# Altium PCB PCB1.PcbDoc (part 1 of 2)
Units mil, origin at the board's own origin, x right, y up, seen from the top; angles counter-clockwise.
Board outline 2505 x 2250 mil, 4 copper layers (Top Layer, GND1, GND2, Bottom Layer), stack 23.756 mil thick; 96 components, 62 nets, 306 pads, 129 vias.
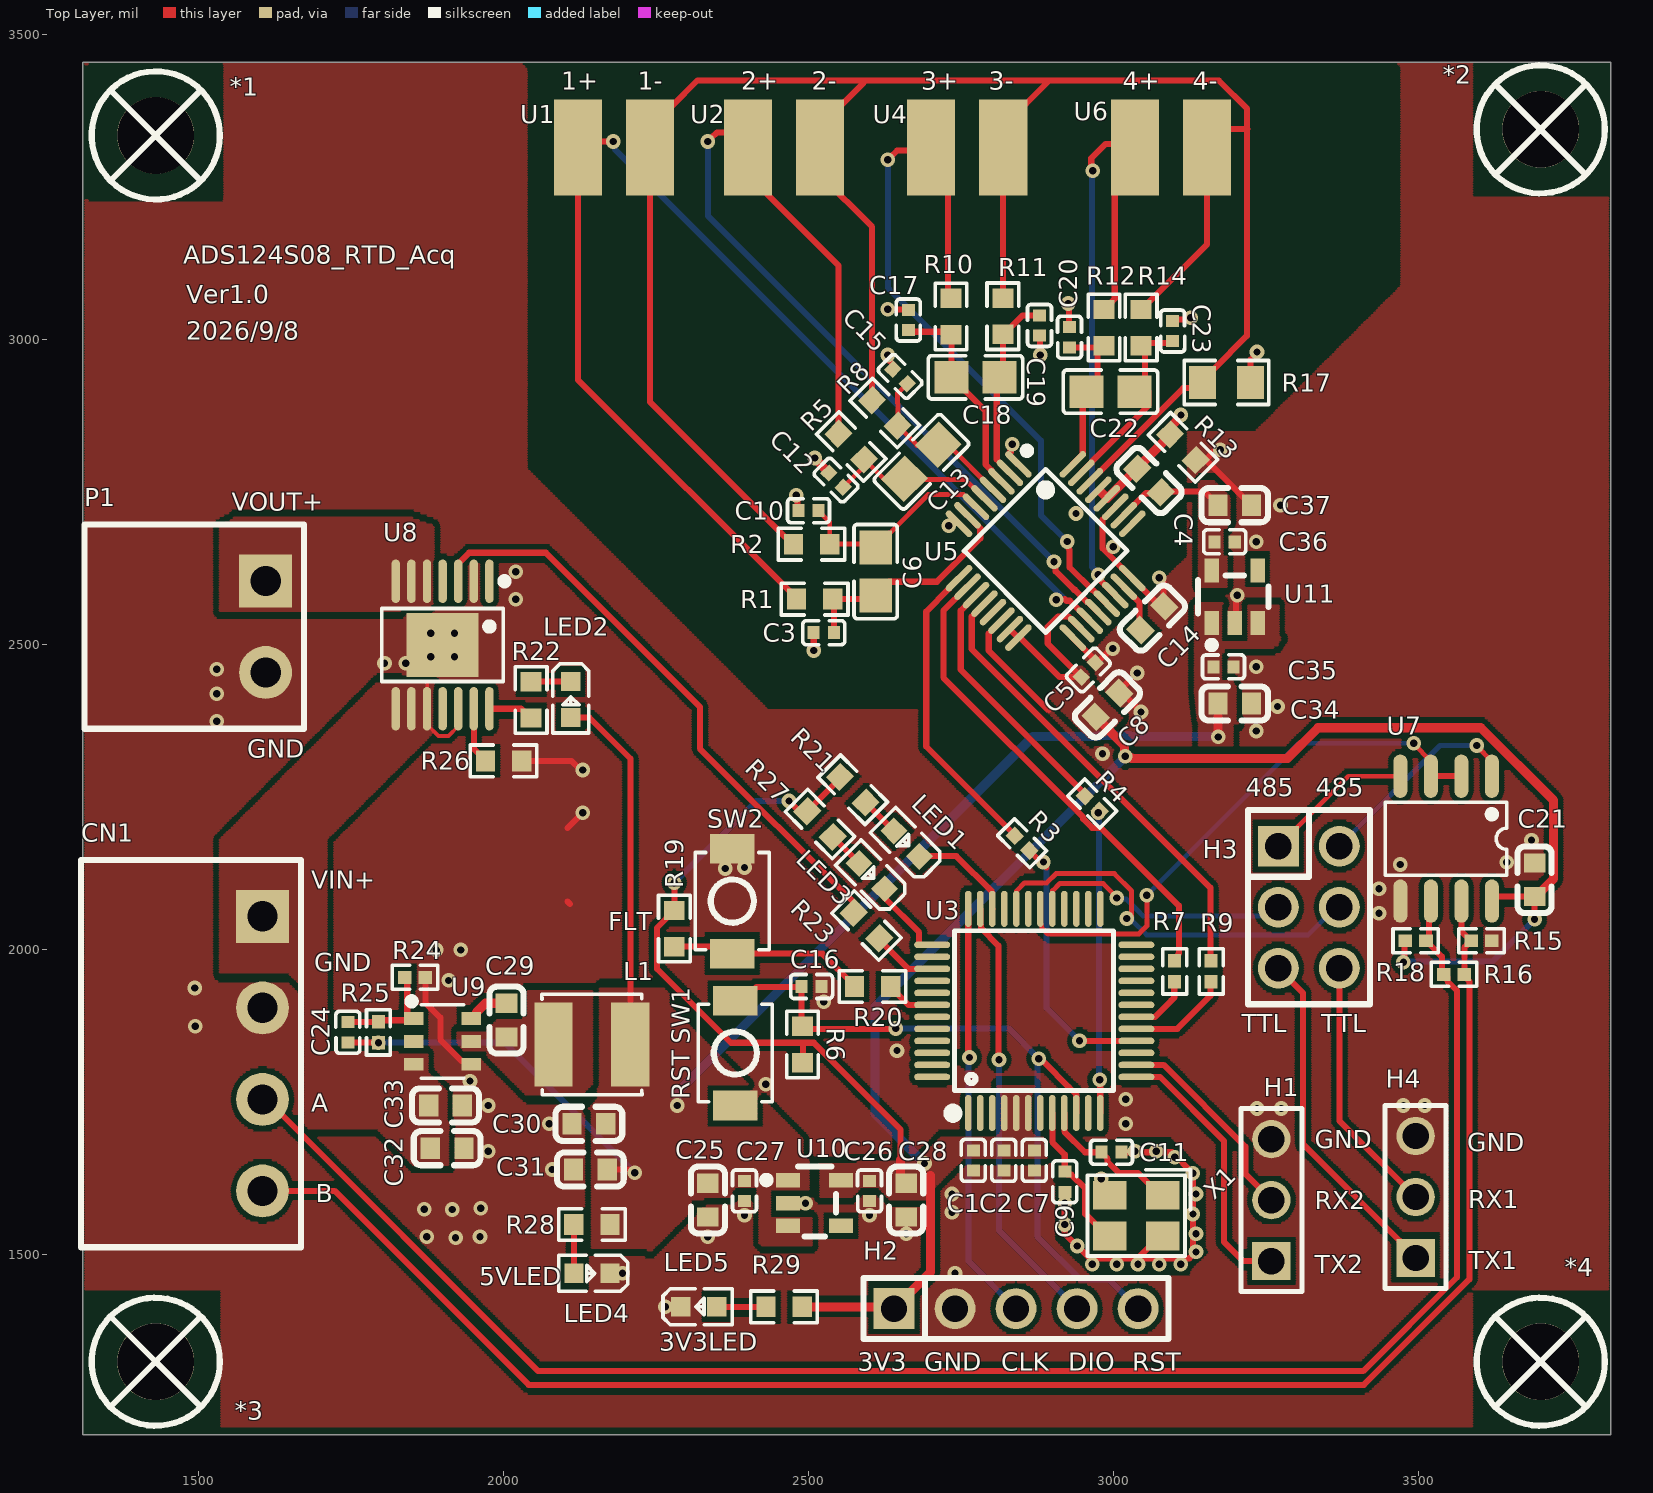
[diagram p0: Top Layer view]
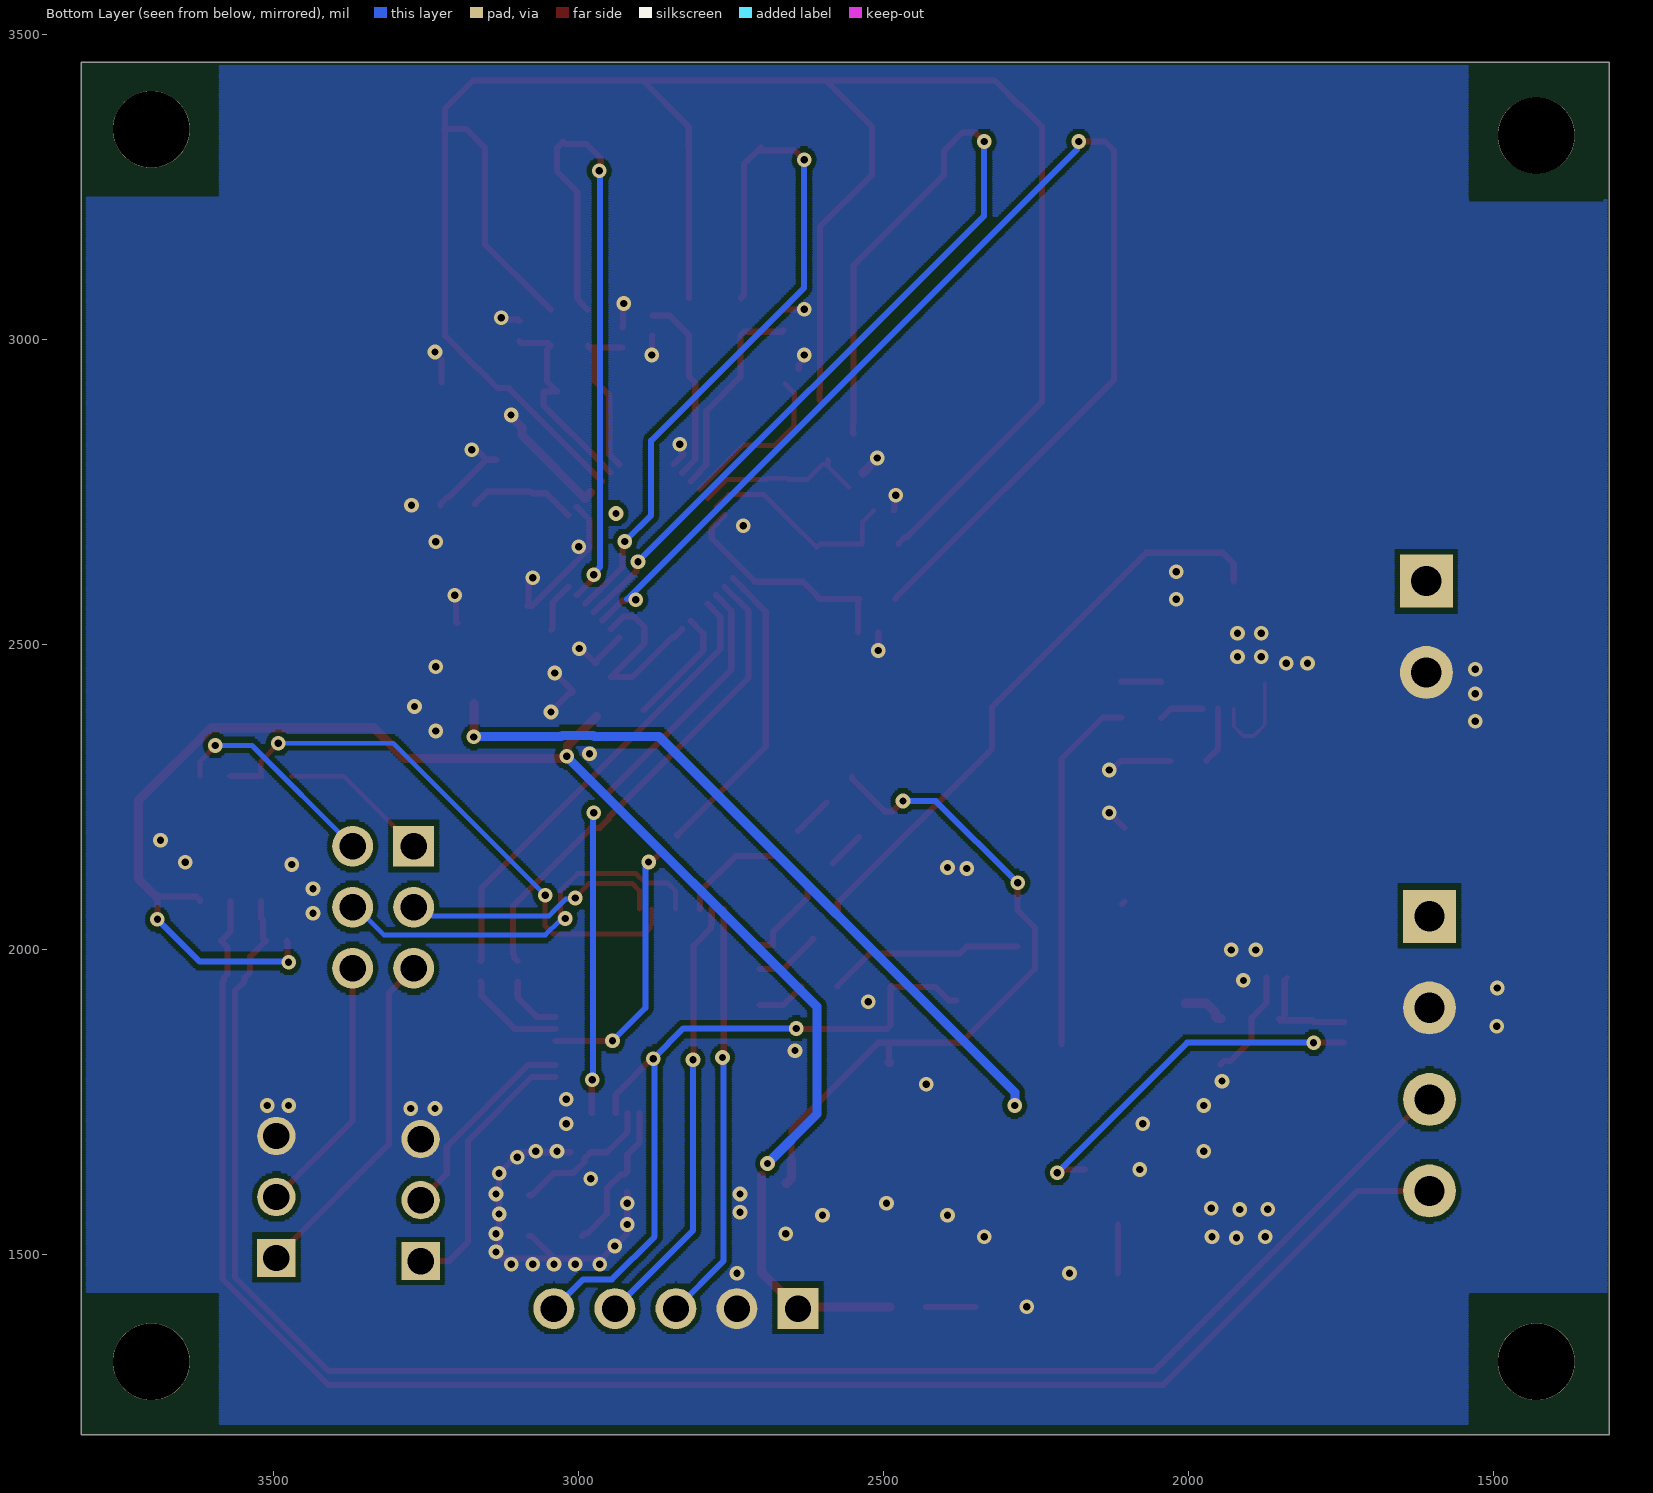
[diagram p1: Bottom Layer view, seen from below]
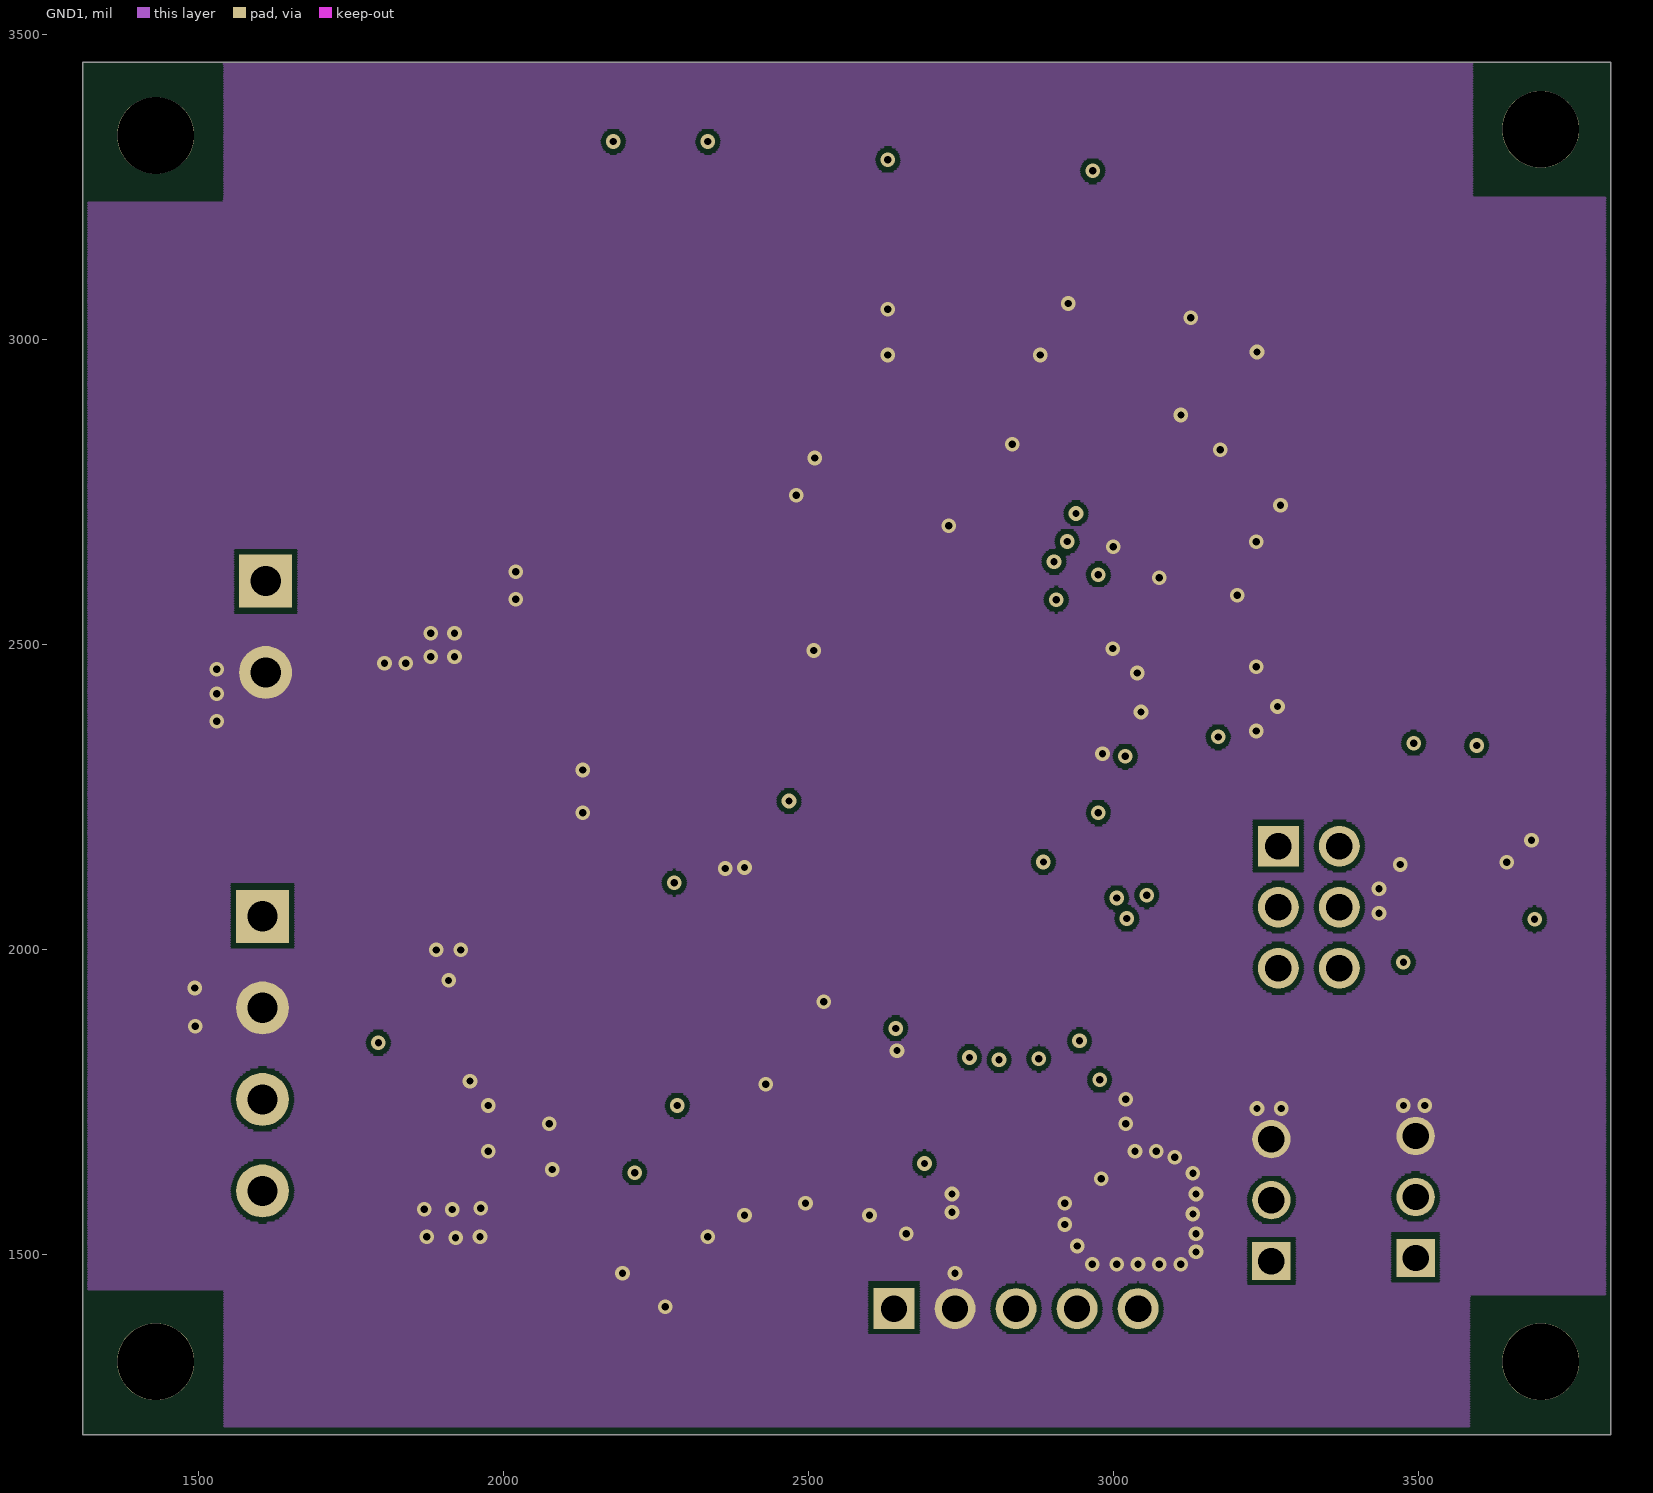
[diagram p2: GND1]
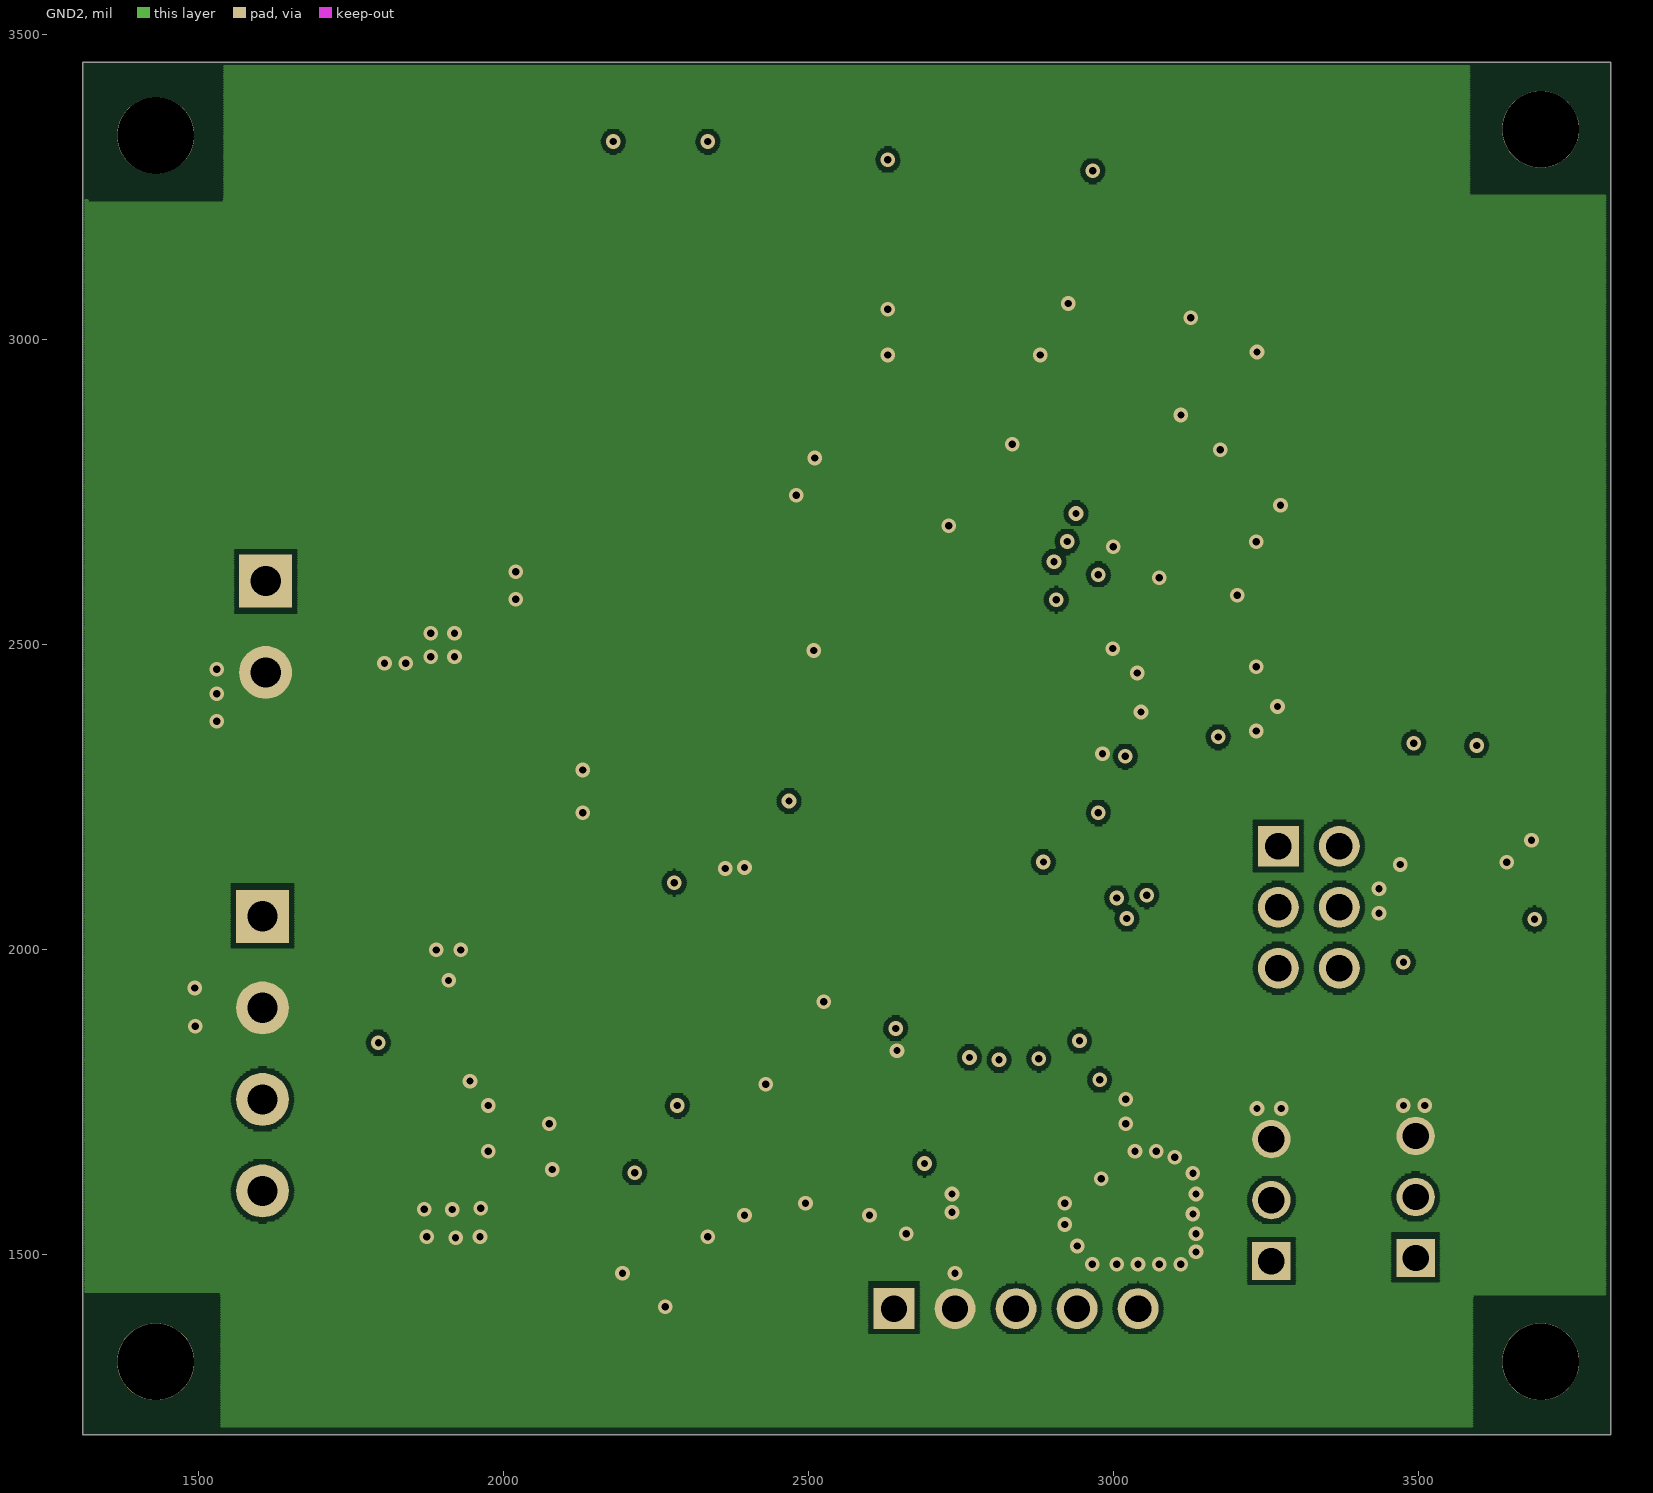
[diagram p3: GND2]

## Layer stack, top to bottom
Top Solder: solder mask 0.4, Solder Resist, Dk 3.5
Top Layer: signal copper 1.4
Dielectric 2: prepreg 2.8, PP-006, Dk 4.1
GND1: signal copper 1.378
Dielectric 1: dielectric 12.6, FR-4, Dk 4.8
GND2: signal copper 1.378
Dielectric 3: prepreg 2.8, PP-006, Dk 4.1
Bottom Layer: signal copper 1.4
Bottom Solder: solder mask 0.4, Solder Resist, Dk 3.5

## Board outline
1310,1205 1310,3455 3815,3455 3815,1205

## Design rules (kind name [scope] priority, off if disabled: settings)
Clearance [All] p1: gap=8 ignorepadtopadclearanceinfootprint=FALSE except(4: Arc-Arc Arc-Track Track-Track; 6: Arc-SMDPad Arc-THPad Arc-Via Track-SMDPad Track-THPad Track-Via SMDPad-SMDPad SMDPad-THPad SMDPad-Via THPad-THPad THPad-Via Via-Via)
ComponentClearance [All] p1: gap=0 collisioncheckmode=3 verticalgap=0 showdistances=FALSE
HoleSize [All] p1: absolutevalues=TRUE maxlimit=130 minlimit=1 maxpercent=80.000 minpercent=20.000
MinimumSolderMaskSliver [All] p1: minsoldermaskwidth=4
PlaneConnect [All] p1: planeconnectstyle=Direct reliefexpansion=20 reliefentries=4 reliefconductorwidth=10 reliefairgap=10
PolygonConnect [All] p1: connectstyle=Direct reliefconductorwidth=10 reliefentries=4 polygonreliefangle="90 Angle" airgapwidth=10
RoutingVias [All] p1: holewidth=28 width=50 viastyle="Through Hole" minholewidth=28 minwidth=50 maxholewidth=28 maxwidth=50
SilkToSilkClearance [All] p1: silktosilkclearance=2
SilkToSolderMaskClearance [IsPad] p1: minsilkscreentomaskgap=2 clearancetoexposedcopper=TRUE
SolderMaskExpansion [All] p1: expansion=0 istentingtop=FALSE
SupplyNets "Schematic Supply Nets_2" [InNet('VOUT')] p1: voltage=0.000
SupplyNets "Schematic Supply Nets_7" [InNet('GND')] p2: voltage=0.000
SupplyNets "Schematic Supply Nets_6" [InNet('VIN')] p3: voltage=0.000
SupplyNets "Schematic Supply Nets_5" [InNet('A3V3')] p4: voltage=0.000
SupplyNets "Schematic Supply Nets" [InNet('3V3')] p5: voltage=0.000
SupplyNets "Schematic Supply Nets_4" [InNet('5V')] p6: voltage=0.000
Width [All] p1: maxlimit=50 minlimit=6 preferedwidth=10
24 further rules are at their usual default settings.

## Components (designator, comment, footprint, x,y, rotation, side; value= is the part's Value field where it differs from the comment)
*1 "螺丝孔_1" M3螺丝 1430,3335 r0 top
*2 "螺丝孔_1" M3螺丝 3700,3345 r0 top
*3 "螺丝孔_1" M3螺丝 1430,1325 r0 top
*4 "螺丝孔_1" M3螺丝 3700,1325 r0 top
C1 "cc0402krx7r7bb104" C0402 2770,1655 r270 top value=100nF
C2 "cc0402krx7r7bb104" C0402 2820,1655 r270 top value=100nF
C3 "grm1555c1h472je01d" C0402 2525,2520 r180 top value=4.7nF
C4 "cl10b474ka8nnnc" C0603 3058.04,2769.4 r135 top value=470nF
C5 "cc0402krx7r7bb104" C0402 2958.55,2458.89 r225 top value=100nF
C6 "cl21b103kbannnc" C0805 2610,2620 r270 top value=10nF
C7 "cc0402krx7r7bb104" C0402 2870,1655 r270 top value=100nF
C8 "hgc0603r5106m350nthj" C0603 2989.94,2401.65 r45 top value=10uF
C9 "cc0402jrnpo9bn180" C0402 2920,1620 r270 top value=18pF
C10 "grm1555c1h472je01d" C0402 2500,2720 r180 top value=4.7nF
C11 "cc0402jrnpo9bn180" C0402 2996.46,1668.39 r180 top value=18pF
C12 "grm1555c1h472je01d" C0402 2545,2770 r135 top value=4.7nF
C13 "cl21b103kbannnc" C0805 2685,2800 r225 top value=10nF
C14 "cga0603x5r105k500jt" C0603 3063.55,2543.89 r45 top value=1uF
C15 "grm1555c1h472je01d" C0402 2650,2940 r135 top value=4.7nF
C16 "cc0402krx7r7bb104" C0402 2505,1940 r180 top value=100nF
C17 "grm1555c1h472je01d" C0402 2663.55,3032.35 r90 top value=4.7nF
C18 "cl21b103kbannnc" C0805 2773.55,2938.55 r180 top value=10nF
C19 "grm1555c1h472je01d" C0402 2878.55,3023.55 r270 top value=4.7nF
C20 "grm1555c1h472je01d" C0402 2927.77,3004.06 r90 top value=4.7nF
C21 "c1608x7r1a155kt000e" C0603 3690,2115 r270 top value=1.5uF
C22 "cl21b103kbannnc" C0805 2995,2915 r180 top value=10nF
C23 "grm1555c1h472je01d" C0402 3096.72,3014.31 r90 top value=4.7nF
C24 "cc0402jrnpo9bn101" C0402 1745,1865 r270 top value=100pF
C25 "cga0603x5r105k500jt" C0603 2335,1590 r270 top value=1uF
C26 "cc0402krx7r7bb104" C0402 2600,1605 r270 top value=100nF
C27 "cc0402krx7r7bb104" C0402 2395,1605 r270 top value=100nF
C28 "cga0603x5r105k500jt" C0603 2660,1590 r270 top value=1uF
C29 "cga0603x7r104k500jt" C0603 2005,1885 r90 top value=100nF
C30 "hgc0603r5226m160nthj" C0603 2140,1715 r0 top value=22uF
C31 "hgc0603r5226m160nthj" C0603 2142.44,1640 r0 top value=22uF
C32 "hgc0603r5106m350nthj" C0603 1907.56,1675 r180 top value=10uF
C33 "cga0603x7r104k500jt" C0603 1905,1745 r180 top value=100nF
C34 "cga0603x5r105k500jt" C0603 3198.55,2403.89 r0 top value=1uF
C35 "cc0402krx7r7bb104" C0402 3180.09,2463.89 r0 top value=100nF
C36 "cc0402krx7r7bb104" C0402 3182.01,2668.89 r0 top value=100nF
C37 "cga0603x5r105k500jt" C0603 3198.55,2728.89 r0 top value=1uF
CN1 "wj15edgrc-3.81-04p-14-00a" CONN-TH_WJ15EDGRC-3.81-4P 1605,1830 r270 top
H1 "lail-pz2.54-3p-l" HDR-TH_3P-P2.54-V-M-1 3258.69,1590 r90 top
H2 "pz254v-11-05p" HDR-TH_5P-P2.54-V-M 2840.05,1412.16 r0 top
H3 "pz254v-12-6p" HDR-TH_6P-P2.54-V-M-R2-C3-S2.54 3320,2070 r270 top
H4 "lail-pz2.54-3p-l" HDR-TH_3P-P2.54-V-M-1 3495,1595 r90 top
L1 "wpn4020h100mt" IND-SMD_L4.0-W4.0 2145,1845 r0 top value=10uH
LED1 "ltst-c190kskt" LED0603-RD 2660.85,2174.15 r135 top
LED2 "ltst-c190kskt" LED0603-RD 2110.18,2410.3 r270 top
LED3 "ltst-c190kskt" LED0603-RD 2603.89,2121.11 r135 top
LED4 "ltst-c190kskt" LED0603-RD 2145,1470 r180 top
LED5 "ltst-c190kskt" LED0603-RD 2320,1415 r0 top
P1 "wj15edgrc-3.81-02p-14-00a" CONN-TH_2P-P3.81_WJ15EDGRC-3.81-2P 1610.17,2529.78 r270 top
R1 "frc0603f1000ts" R0603 2510,2575 r180 top value=100Ω
R2 "frc0603f1000ts" R0603 2505,2665 r180 top value=100Ω
R3 "frc0402f47r0ts" R0402 2850,2175 r135 top value=47Ω
R4 "frc0402f47r0ts" R0402 2965,2240 r135 top value=47Ω
R5 "frc0603f1000ts" R0603 2570,2825 r135 top value=100Ω
R6 "frc0603f1002ts" R0603 2490,1845 r270 top value=10kΩ
R7 "frc0402f47r0ts" R0402 3100,1965 r90 top value=47Ω
R8 "frc0603f1000ts" R0603 2625,2880 r135 top value=100Ω
R9 "frc0402f47r0ts" R0402 3160,1965 r90 top value=47Ω
R10 "frc0603f1000ts" R0603 2733.55,3038.21 r90 top value=100Ω
R11 "frc0603f1000ts" R0603 2818.55,3038.55 r90 top value=100Ω
R12 "frc0603f1000ts" R0603 2984.32,3020 r90 top value=100Ω
R13 "0603waf0000t5e" R0603 3113.55,2823.89 r135 top value=0Ω
R14 "frc0603f1000ts" R0603 3045,3020 r90 top value=100Ω
R15 "0402wgf1001tce" R0402 3602.96,2015 r0 top value=1kΩ
R16 "0402wgf1200tce" R0402 3557.96,1960 r0 top value=120Ω
R17 "frc0805f3001ts" R0805 3185,2930 r0 top value=3kΩ
R18 "0402wgf1001tce" R0402 3495,2015 r0 top value=1kΩ
R19 "frc0603f4701ts" R0603 2280,2035 r90 top value=4.7kΩ
R20 "frc0603j471 ts" R0603 2605,1940 r180 top value=470Ω
R21 "0603waf1001t5e" R0603 2572.47,2262.54 r135 top value=1kΩ
R22 "0603waf1001t5e" R0603 2045.17,2409.78 r90 top value=1kΩ
R23 "0603waf1001t5e" R0603 2595,2040 r135 top value=1kΩ
R24 "rt0402brd0726k1l" R0402 1855,1955 r180 top value=26.1kΩ
R25 "frc0402f1373ts" R0402 1795,1865 r90 top value=137kΩ
R26 "frc0603f3601ts" R0603 2000.17,2309.78 r0 top value=3.6kΩ
R27 "0603waf1001t5e" R0603 2518.8,2206.2 r135 top value=1kΩ
R28 "0603waf1001t5e" R0603 2145,1550 r0 top value=1kΩ
R29 "0603waf1001t5e" R0603 2460,1415 r0 top value=1kΩ
SW1 "ts-1088-ar02016" SW-SMD_L3.9-W3.0-P4.45 2380,1831.02 r90 top
SW2 "ts-1088-ar02016" SW-SMD_L3.9-W3.0-P4.45 2375,2080 r270 top
U1 "pt1000焊盘" PT1000焊盘 2121.89,3315 r0 top
U2 "pt1000焊盘" PT1000焊盘 2400.44,3315 r0 top
U3 "stm32g031c8t6" LQFP-48_L7.0-W7.0-P0.50-LS9.0-BL 2870,1900 r0 top
U4 "pt1000焊盘" PT1000焊盘 2701.04,3315 r0 top
U5 "ads124s08ipbsr_c39676001" TQFP-32_L5.0-W5.0-P0.50-LS7.0-BL 2888.55,2653.89 r225 top
U6 "pt1000焊盘" PT1000焊盘 3035,3315 r0 top
U7 "sn65hvd75dr" SOIC-8_L4.9-W3.9-P1.27-LS6.0-BL 3545,2182.37 r180 top
U8 "tps27s100apwpr" TSSOP-14_L5.0-W4.4-P0.65-LS6.4-BL-EP 1900.17,2499.78 r180 top
U9 "ap63201wu-7" TSOT-23-6_L2.9-W1.6-P0.95-LS2.8-BR 1900,1850 r180 top
U10 "tps7a2033pdbvr" SOT-23-5_L2.9-W1.6-P0.95-LS2.8-BR 2510,1585 r180 top
U11 "tps7a2033pdbvr" SOT-23-5_L2.9-W1.6-P0.95-LS2.8-BR 3198.55,2578.89 r270 top
X1 "x32258mob4si" CRYSTAL-SMD_4P-L3.2-W2.5-BL 3037.18,1564.39 r180 top value=8MHz

## Footprints (in the part's own frame and the unit in brackets; to place one, negate y for a bottom-side part, rotate by r counter-clockwise, add the part's x,y. Pads: shape width x height; smd on the part's side, far side on the other; paste and mask are expansions set on the pad)
C0402 [mm]
  rect 0.5x0.54 smd: 1(-0.42,0) 2(0.42,0)
  silkscreen extent -0.87,-0.5 0.87,0.5
C0603 [mm]
  rect 0.8x0.9 smd: 1(-0.7,0) 2(0.7,0)
  silkscreen extent -1.39,-0.71 1.39,0.71
C0805 [mm]
  rect 1.41x1.35 smd paste-100 mask+0.051: 1(-1,0) 2(1,0)
  silkscreen extent -1.96,-0.9 1.96,0.9
CONN-TH_2P-P3.81_WJ15EDGRC-3.81-2P [mm]
  rect 2.2x2.2 hole 1.26: 1(-1.905,0)
  round 2.2 hole 1.26: 2(1.905,0)
  silkscreen extent -4.25,-7.55 4.25,1.6
CONN-TH_WJ15EDGRC-3.81-4P [mm]
  rect 2.2x2.2 hole 1.26: 1(-5.715,0)
  round 2.2 hole 1.26: 2(-1.905,0) 3(1.905,0) 4(5.715,0)
  silkscreen extent -8.06,-7.55 8.06,1.6
CRYSTAL-SMD_4P-L3.2-W2.5-BL [mm]
  rect 1.4x1.2 smd: 1(-1.1,-0.85) 2(1.1,-0.85) 3(1.1,0.85) 4(-1.1,0.85)
  silkscreen extent -2.26,-1.91 2.03,1.68
HDR-TH_3P-P2.54-V-M-1 [mm]
  rect 1.575x1.6 hole 1.1 paste-2539.97 mask+0.05: 1(-2.54,0)
  round 1.6 hole 1.1 paste-2539.97 mask+0.05: 2(0,0) 3(2.54,0)
  silkscreen extent -3.81,-1.27 3.81,1.27
HDR-TH_5P-P2.54-V-M [mm]
  rect 1.7x1.7 hole 1.1: 1(-5.08,0)
  round 1.7 hole 1.1: 2(-2.54,0) 3(0,0) 4(2.54,0) 5(5.08,0)
  silkscreen extent -6.35,-1.27 6.35,1.27
HDR-TH_6P-P2.54-V-M-R2-C3-S2.54 [mm]
  rect 1.7x1.7 hole 1.1: 1(-2.54,-1.27)
  round 1.7 hole 1.1: 2(-2.54,1.27) 3(0,-1.27) 4(0,1.27) 5(2.54,-1.27) 6(2.54,1.27)
  silkscreen extent -4.04,-2.54 4.04,2.54
IND-SMD_L4.0-W4.0 [mm]
  rect 1.6x3.5 smd: 1(-1.6,0) 2(1.6,0)
  silkscreen extent -2.08,-2.1 2.08,2.1
LED0603-RD [mm]
  rect 0.8x0.8 smd: 1(-0.749,0) 2(0.749,0)
  silkscreen extent -1.49,-0.75 1.39,0.76
LQFP-48_L7.0-W7.0-P0.50-LS9.0-BL [mm]
  oval 0.27x1.5 smd paste+0 mask+0.05: 1(-2.75,-4.25) 2(-2.25,-4.25) 3(-1.75,-4.25) 4(-1.25,-4.25) 5(-0.75,-4.25) 6(-0.25,-4.25) 7(0.25,-4.25) 8(0.75,-4.25) 9(1.25,-4.25) 10(1.75,-4.25) 11(2.25,-4.25) 12(2.75,-4.25) 25(2.75,4.25) 26(2.25,4.25) 27(1.75,4.25) 28(1.25,4.25) 29(0.75,4.25) 30(0.25,4.25) 31(-0.25,4.25) 32(-0.75,4.25) 33(-1.25,4.25) 34(-1.75,4.25) 35(-2.25,4.25) 36(-2.75,4.25)
  oval 1.5x0.27 smd paste+0 mask+0.05: 13(4.25,-2.75) 14(4.25,-2.25) 15(4.25,-1.75) 16(4.25,-1.25) 17(4.25,-0.75) 18(4.25,-0.25) 19(4.25,0.25) 20(4.25,0.75) 21(4.25,1.25) 22(4.25,1.75) 23(4.25,2.25) 24(4.25,2.75) 37(-4.25,2.75) 38(-4.25,2.25) 39(-4.25,1.75) 40(-4.25,1.25) 41(-4.25,0.75) 42(-4.25,0.25) 43(-4.25,-0.25) 44(-4.25,-0.75) 45(-4.25,-1.25) 46(-4.25,-1.75) 47(-4.25,-2.25) 48(-4.25,-2.75)
  silkscreen extent -3.59,-4.46 3.3,3.34
M3螺丝 [mil]
  round 126 hole 126 paste-99999 mask+4: 1(0,0)
  silkscreen extent -105,-105 105,105
PT1000焊盘 [mm]
  rect 2x4 smd: 1(0,0) 2(3,0)
R0402 [mm]
  rect 0.566x0.54 smd paste-100 mask+0.051: 1(-0.433,0) 2(0.433,0)
  silkscreen extent -0.94,-0.5 0.94,0.5
R0603 [mil]
  rect 31.75x34.02 smd paste-3937.01 mask+2: 1(-29.66,0) 2(29.66,0)
  silkscreen extent -55,-26 55,26
R0805 [mil]
  rect 44.59x54.21 smd paste-3937.01 mask+2: 1(-39.37,0) 2(39.37,0)
  silkscreen extent -69,-36 69,36
SOIC-8_L4.9-W3.9-P1.27-LS6.0-BL [mm]
  oval 0.588x1.8 smd paste+0 mask+0.051: 1(-1.905,-2.6) 2(-0.635,-2.6) 3(0.635,-2.6) 4(1.905,-2.6) 5(1.905,2.6) 6(0.635,2.6) 7(-0.635,2.6) 8(-1.905,2.6)
  silkscreen extent -2.53,-1.52 2.53,1.52
SOT-23-5_L2.9-W1.6-P0.95-LS2.8-BR [mm]
  rect 1x0.6 smd paste+0 mask+0.05: 1(1.1,-0.95) 2(1.1,0) 3(1.1,0.95) 4(-1.1,0.95) 5(-1.1,-0.95)
  silkscreen extent -0.89,-1.52 2.16,1.4
SW-SMD_L3.9-W3.0-P4.45 [mm]
  rect 1.23x1.86 smd: 1(-2.185,0) 2(2.185,0)
  silkscreen extent -2.03,-1.54 2.03,1.54
TQFP-32_L5.0-W5.0-P0.50-LS7.0-BL [mm]
  oval 0.28x1.45 smd: 1(-1.75,-3.35) 2(-1.25,-3.35) 3(-0.75,-3.35) 4(-0.25,-3.35) 5(0.25,-3.35) 6(0.75,-3.35) 7(1.25,-3.35) 8(1.75,-3.35) 17(1.75,3.35) 18(1.25,3.35) 19(0.75,3.35) 20(0.25,3.35) 21(-0.25,3.35) 22(-0.75,3.35) 23(-1.25,3.35) 24(-1.75,3.35)
  oval 1.45x0.28 smd: 9(3.35,-1.75) 10(3.35,-1.25) 11(3.35,-0.75) 12(3.35,-0.25) 13(3.35,0.25) 14(3.35,0.75) 15(3.35,1.25) 16(3.35,1.75) 25(-3.35,1.75) 26(-3.35,1.25) 27(-3.35,0.75) 28(-3.35,0.25) 29(-3.35,-0.25) 30(-3.35,-0.75) 31(-3.35,-1.25) 32(-3.35,-1.75)
  silkscreen extent -2.55,-3.65 2.4,2.4
TSOT-23-6_L2.9-W1.6-P0.95-LS2.8-BR [mm]
  rect 0.8x0.532 smd: 1(1.2,-0.95) 2(1.2,0) 3(1.2,0.95) 4(-1.2,0.95) 5(-1.2,0) 6(-1.2,-0.95)
  silkscreen extent -0.88,-1.82 1.44,1.53
TSSOP-14_L5.0-W4.4-P0.65-LS6.4-BL-EP [mm]
  oval 0.35x1.809 smd: 1(-1.95,-2.655) 2(-1.3,-2.655) 3(-0.65,-2.655) 4(0,-2.655) 5(0.65,-2.655) 6(1.3,-2.655) 7(1.95,-2.655) 8(1.95,2.655) 9(1.3,2.655) 10(0.65,2.655) 11(0,2.655) 12(-0.65,2.655) 13(-1.3,2.655) 14(-1.95,2.655)
  rect 3x2.65 smd: 15(0,0)
  silkscreen extent -2.73,-2.8 2.53,1.52

## Part data
C1 C2 C5 C7 C16 C26 C27 C35 C36: "容值:100nF;精度:±10%;额定电压:16V;温度系数:X7R;", JLCPCB Part Class="Extended Part", LCSC Part Name="100nF ±10% 16V", Manufacturer=YAGEO(国巨), ManufacturerPart=CC0402KRX7R7BB104, Temperature Coefficient=X7R, Tolerance=±10%, Voltage Rating=16V, AddInBom=yes, ConvertToPcb=yes, Datasheet=https://item.szlcsc.com/datasheet/CC0402KRX7R7BB104/61526.html, FootprintName=C0402, ModelId=36a51122f27c49738f86b3bfa98863e0, ModelName=C0402_L1.0-W0.5-H0.5, ModelTransform=39.37,19.685,0,0,0,0,0,0,0, Supplier=LCSC, Supplier Footprint=0402, SupplierPart=C60474, Symbol=CC0402KRX7R7BB104
C3 C10 C12 C15 C17 C19 C20 C23: "容值:4.7nF;精度:±5%;额定电压:50V;温度系数:C0G;", JLCPCB Part Class="Extended Part", LCSC Part Name="4.7nF ±5% 50V", Manufacturer=muRata(村田), ManufacturerPart=GRM1555C1H472JE01D, Temperature Coefficient=C0G, Tolerance=±5%, Voltage Rating=50V, AddInBom=yes, ConvertToPcb=yes, Datasheet=https://item.szlcsc.com/datasheet/GRM1555C1H472JE01D/1609001.html, FootprintName=C0402, ModelId=36a51122f27c49738f86b3bfa98863e0, ModelName=C0402_L1.0-W0.5-H0.5, ModelTransform=39.37,19.685,0,0,0,0,0,0,0, Supplier=LCSC, Supplier Footprint=0402, SupplierPart=C1518204, Symbol=GRM1555C1H472JE01D
C4: "容值:470nF;精度:±10%;额定电压:25V;温度系数:X7R;", JLCPCB Part Class="Basic Part", LCSC Part Name="470nF ±10% 25V", Manufacturer=SAMSUNG(三星), ManufacturerPart=CL10B474KA8NNNC, Temperature Coefficient=X7R, Tolerance=±10%, Voltage Rating=25V, AddInBom=yes, ConvertToPcb=yes, Datasheet=https://item.szlcsc.com/datasheet/CL10B474KA8NNNC/1975.html, FootprintName=C0603, ModelId=ac125912035d415993ca9572d50418b1, ModelName=C0603_L1.6-W0.8-H0.8, ModelTransform=62.992,31.496,0,0,0,0,0,0,0, Supplier=LCSC, Supplier Footprint=0603, SupplierPart=C1623, Symbol=CL10B474KA8NNNC
C6 C13 C18 C22: "容值:10nF;精度:±10%;额定电压:50V;温度系数:X7R;", JLCPCB Part Class="Basic Part", LCSC Part Name="10nF ±10% 50V", Manufacturer=SAMSUNG(三星), ManufacturerPart=CL21B103KBANNNC, Temperature Coefficient=X7R, Tolerance=±10%, Voltage Rating=50V, AddInBom=yes, ConvertToPcb=yes, Datasheet=https://item.szlcsc.com/datasheet/CL21B103KBANNNC/2062.html, FootprintName=C0805, ModelId=1ba041120af144c991958decab20d241, ModelName=C0805_L2.0-W1.3-H1.3, ModelTransform=78.74,51.181,0,0,0,0,0,0.0005,0, Supplier=LCSC, Supplier Footprint=0805, SupplierPart=C1710, Symbol=CL21B103KBANNNC
C8 C32: "容值:10uF;精度:±20%;额定电压:35V;温度系数:X5R;", JLCPCB Part Class="Extended Part", LCSC Part Name="10uF ±20% 35V", Manufacturer=Chinocera(华瓷), ManufacturerPart=HGC0603R5106M350NTHJ, Temperature Coefficient=X5R, Tolerance=±20%, Voltage Rating=35V, AddInBom=yes, ConvertToPcb=yes, Datasheet=https://item.szlcsc.com/datasheet/HGC0603R5106M350NTHJ/23841132.html, FootprintName=C0603, ModelId=ac125912035d415993ca9572d50418b1, ModelName=C0603_L1.6-W0.8-H0.8, ModelTransform=62.992,31.496,0,0,0,0,0,0,0, Supplier=LCSC, Supplier Footprint=0603, SupplierPart=C22367827, Symbol=HGC0603R5106M350NTHJ
C9 C11: "容值:18pF;精度:±5%;额定电压:50V;温度系数:NP0;", JLCPCB Part Class="Extended Part", LCSC Part Name="18pF ±5% 50V", Manufacturer=YAGEO(国巨), ManufacturerPart=CC0402JRNPO9BN180, Temperature Coefficient=NP0, Tolerance=±5%, Voltage Rating=50V, AddInBom=yes, ConvertToPcb=yes, Datasheet=https://item.szlcsc.com/datasheet/CC0402JRNPO9BN180/107417.html, FootprintName=C0402, ModelId=36a51122f27c49738f86b3bfa98863e0, ModelName=C0402_L1.0-W0.5-H0.5, ModelTransform=39.37,19.685,0,0,0,0,0,0,0, Supplier=LCSC, Supplier Footprint=0402, SupplierPart=C106202, Symbol=CC0402JRNPO9BN180
C14 C25 C28 C34 C37: "容值:1uF;精度:±10%;额定电压:50V;温度系数:X5R;", JLCPCB Part Class="Extended Part", LCSC Part Name="1uF ±10% 50V 停产", Manufacturer=HRE(芯声), ManufacturerPart=CGA0603X5R105K500JT, Temperature Coefficient=X5R, Tolerance=±10%, Voltage Rating=50V, AddInBom=yes, ConvertToPcb=yes, Datasheet=https://item.szlcsc.com/datasheet/CGA0603X5R105K500JT/7062558.html, FootprintName=C0603, ModelId=ac125912035d415993ca9572d50418b1, ModelName=C0603_L1.6-W0.8-H0.8, ModelTransform=62.992,31.496,0,0,0,0,0,0,0, Supplier=LCSC, Supplier Footprint=0603, SupplierPart=C6119852, Symbol=CGA0603X5R105K500JT
C21: "容值:1.5uF;精度:±10%;额定电压:10V;温度系数:X7R;", JLCPCB Part Class="Extended Part", LCSC Part Name="1.5uF ±10% 10V", Manufacturer=TDK, ManufacturerPart=C1608X7R1A155KT000E, Temperature Coefficient=X7R, Tolerance=±10%, Voltage Rating=10V, AddInBom=yes, ConvertToPcb=yes, Datasheet=https://item.szlcsc.com/datasheet/C1608X7R1A155KT000E/336024.html, FootprintName=C0603, ModelId=ac125912035d415993ca9572d50418b1, ModelName=C0603_L1.6-W0.8-H0.8, ModelTransform=62.992,31.496,0,0,0,0,0,0,0, Supplier=LCSC, Supplier Footprint=0603, SupplierPart=C361193, Symbol=C1608X7R1A155KT000E
C24: "容值:100pF;精度:±5%;额定电压:50V;温度系数:NP0;", JLCPCB Part Class="Extended Part", LCSC Part Name="100pF ±5% 50V", Manufacturer=YAGEO(国巨), ManufacturerPart=CC0402JRNPO9BN101, Temperature Coefficient=NP0, Tolerance=±5%, Voltage Rating=50V, AddInBom=yes, ConvertToPcb=yes, Datasheet=https://item.szlcsc.com/datasheet/CC0402JRNPO9BN101/107415.html, FootprintName=C0402, ModelId=36a51122f27c49738f86b3bfa98863e0, ModelName=C0402_L1.0-W0.5-H0.5, ModelTransform=39.37,19.685,0,0,0,0,0,0,0, Supplier=LCSC, Supplier Footprint=0402, SupplierPart=C106200, Symbol=CC0402JRNPO9BN101
C29 C33: "容值:100nF;精度:±10%;额定电压:50V;温度系数:X7R;", JLCPCB Part Class="Extended Part", LCSC Part Name="100nF ±10% 50V", Manufacturer=HRE(芯声), ManufacturerPart=CGA0603X7R104K500JT, Temperature Coefficient=X7R, Tolerance=±10%, Voltage Rating=50V, AddInBom=yes, ConvertToPcb=yes, Datasheet=https://item.szlcsc.com/datasheet/CGA0603X7R104K500JT/7062573.html, FootprintName=C0603, ModelId=ac125912035d415993ca9572d50418b1, ModelName=C0603_L1.6-W0.8-H0.8, ModelTransform=62.992,31.496,0,0,0,0,0,0,0, Supplier=LCSC, Supplier Footprint=0603, SupplierPart=C6119867, Symbol=CGA0603X7R104K500JT
C30 C31: "容值:22uF;精度:±20%;额定电压:16V;温度系数:X5R;", JLCPCB Part Class="Extended Part", LCSC Part Name="22uF ±20% 16V", Manufacturer=Chinocera(华瓷), ManufacturerPart=HGC0603R5226M160NTHJ, Temperature Coefficient=X5R, Tolerance=±20%, Voltage Rating=16V, AddInBom=yes, ConvertToPcb=yes, Datasheet=https://item.szlcsc.com/datasheet/HGC0603R5226M160NTHJ/23841133.html, FootprintName=C0603, ModelId=ac125912035d415993ca9572d50418b1, ModelName=C0603_L1.6-W0.8-H0.8, ModelTransform=62.992,31.496,0,0,0,0,0,0,0, Supplier=LCSC, Supplier Footprint=0603, SupplierPart=C22367828, Symbol=HGC0603R5226M160NTHJ
CN1: "连接器类型:板端/插座-闭口;固定方式:无固定装置;结构:1x4P;间距:3.81mm;颜色:绿色;安装方式:弯插;排数:1;每排PIN数:4;额定电流:8A;额定电压:300V;线规 - AWG:-;线规 - 平方毫米:-;工作温度:-40℃~+105℃;", Color=绿色, Current Rating=8A, JLCPCB Part Class="Extended Part", LCSC Part Name="无固定装置 1x4P 3.81mm 排数:1 每排P数:4", Manufacturer=KANGNEX(康奈克斯电气), ManufacturerPart=WJ15EDGRC-3.81-04P-14-00A, Operating Temperature=-40℃~+105℃, Voltage Rating (Max)=300V, AddInBom=yes, Connection Type=-, Connector Type=板端/插座-闭口, ConvertToPcb=yes, Datasheet=https://item.szlcsc.com/datasheet/WJ15EDGRC-3.81-04P-14-00A/7720.html, FootprintName=CONN-TH_WJ15EDGRC-3.81-4P, ModelId=4512f1cc0fee4248839d43b222858c36, ModelName=CONN-TH_4P_L16.1-W9.2-H7.0-P3.81, ModelTransform=634.6483,360.2355,0,0,0,0,0,-117.126,-137.795, Mounting Type=弯插, Number of Pins=4P, Number of PINs Per Row=4, Number of Positions or Pins=1x4P, Number of Rows=1, Outlet Direction (Vertical Basis)=-, Pitch=3.81mm, Supplier=LCSC, Supplier Footprint=弯插,P=3.81mm, SupplierPart=C7245, Symbol=WJ15EDGRC-3.81-4P, Termination Style=无固定装置, Wire Gauge - AWG=-, Wire Gauge - mm2=-
H1 H4: "插针结构:1x3P;间距:2.54mm;圆针/方针:方针;排数:单排;总PIN位数:3P;额定电流:3A;额定电压:250V;塑高:2.5mm;端接针长度:3mm;触头材质:黄铜;触头镀层:金;工作温度:-25℃~+80℃;颜色:黑色;", Color=黑色, Current Rating=3A, JLCPCB Part Class="Extended Part", LCSC Part Name="1x3P 间距:2.54mm 方针", Manufacturer=LAILAN(莱联), ManufacturerPart=LAIL-PZ2.54-3P-L, Operating Temperature=-25℃~+80℃, Voltage Rating (Max)=250V, AddInBom=yes, Circluar Pins/Square Pins=方针, Contact Material=黄铜, Contact Plating=金, ConvertToPcb=yes, Datasheet=https://item.szlcsc.com/datasheet/LAIL-PZ2.54-3P-L/58519957.html, FootprintName=HDR-TH_3P-P2.54-V-M-1, Insulation Height=2.5mm, Length of End Connection Pin=3mm, ModelId=94a8ffe137b6410295cb18cd3ffd99db, ModelName=HDR-M-2.54_1x3, ModelTransform=299.9994,100,0,0,0,0,0,0,-118.11, Number of Pins=3P, Number of Rows=单排, Pin Structure=1x3P, Pitch=2.54mm, Supplier=LCSC, Supplier Footprint=插件,P=2.54mm, SupplierPart=C54950604, SymbolName=LAIL-PZ2.54-3P-L
H2: "插针结构:1x5P;间距:2.54mm;行距:-;圆针/方针:方针;安装方式:直插;排数:单排;总PIN位数:5P;额定电流:3A;额定电压:250V;配合针长度:6mm;塑高:2.5mm;端接针长度:3mm;触头材质:黄铜;触头镀层:-;工作温度:-40℃~+105℃;颜色:黑色;", Color=黑色, Current Rating=3A, JLCPCB Part Class="Extended Part", LCSC Part Name="1x5P 间距:2.54mm 方针 直插", Manufacturer=XFCN(兴飞), ManufacturerPart=PZ254V-11-05P, Operating Temperature=-40℃~+105℃, Voltage Rating (Max)=250V, AddInBom=yes, Circluar Pins/Square Pins=方针, Contact Material=黄铜, Contact Plating=-, ConvertToPcb=yes, Datasheet=https://item.szlcsc.com/datasheet/PZ254V-11-05P/502960.html, FootprintName=HDR-TH_5P-P2.54-V-M, Insulation Height=2.5mm, Length of End Connection Pin=3mm, Length of Mating Pin=6mm, ModelId=47d466e4a34f4fc5bc626cf773a24dd5, ModelName=HDR-TH_5P-P2.54-M-LI-1X5P, ModelTransform=499.999,100,0,0,0,0,0,0,-118.11, Mounting Type=直插, Number of Pins=5P, Number of Rows=单排, Pin Structure=1x5P, Pitch=2.54mm, Row Spacing=-, Supplier=LCSC, Supplier Footprint=插件,P=2.54mm, SupplierPart=C492404, Symbol=PZ254V-11-05P
H3: "插针结构:2x3P;间距:2.54mm;行距:2.54mm;圆针/方针:方针;安装方式:直插;排数:双排;总PIN位数:6P;额定电流:3A;额定电压:-;配合针长度:6mm;塑高:2.5mm;端接针长度:3mm;触头材质:黄铜;触头镀层:金;工作温度:-40℃~+105℃;颜色:黑色;", Color=黑色, Current Rating=3A, JLCPCB Part Class="Extended Part", LCSC Part Name="2x3P 间距:2.54mm 方针 直插", Manufacturer=XFCN(兴飞), ManufacturerPart=PZ254V-12-6P, Operating Temperature=-40℃~+105℃, Voltage Rating (Max)=-, AddInBom=yes, Circluar Pins/Square Pins=方针, Contact Material=黄铜, Contact Plating=金, ConvertToPcb=yes, Datasheet=https://item.szlcsc.com/datasheet/PZ254V-12-6P/502976.html, FootprintName=HDR-TH_6P-P2.54-V-M-R2-C3-S2.54, Insulation Height=2.5mm, Length of End Connection Pin=3mm, Length of Mating Pin=6mm, ModelId=e22692306cbd4b5c8488f4142eed6b9c, ModelName=HDR-TH_6P-P2.54-V-M-R2-C3-S2.54, ModelTransform=300.3931,200,0,0,0,0,0,0,-118.11, Mounting Type=直插, Number of Pins=6P, Number of Rows=双排, Pin Structure=2x3P, Pitch=2.54mm, Row Spacing=2.54mm, Supplier=LCSC, Supplier Footprint=插件,P=2.54mm, SupplierPart=C492420, Symbol=PZ254V-12-6P
L1: "电感值:10uH;精度:±20%;额定电流:2A;饱和电流(Isat):3.5A;类型:-;", Current - Saturation(Isat)=3.5A, Current Rating=2A, DC Resistance(DCR)=216mΩ, JLCPCB Part Class="Extended Part", LCSC Part Name="10uH ±20% 3.5A", Manufacturer=Sunlord(顺络), ManufacturerPart=WPN4020H100MT, Ratings=-, Tolerance=±20%, AddInBom=yes, ConvertToPcb=yes, Datasheet=https://item.szlcsc.com/datasheet/WPN4020H100MT/99573.html, FootprintName=IND-SMD_L4.0-W4.0, ModelId=45bc3737ecfd4f3bb122605ee525b018, ModelName=IND-SMD_L4.0-W4.0-H1.9, ModelTransform=157.48,157.484,0,0,0,0,0,0,0, Supplier=LCSC, Supplier Footprint=SMD,4x4mm, SupplierPart=C98364, Symbol=WPN4020H100MT, Type=-
LED1 LED2 LED3 LED4 LED5: "灯头类型:-;发光颜色:黄色;正向压降(Vf):2.1V;功率:75mW;正向电流:20mA;波长:584.5nm~597nm;二极管配置:独立二极管;透镜颜色:无色透明透镜;色温:-;发光强度:104mcd;发光角度:130°;载带方式:-;工作温度:-30℃~+85℃;", Color Temperature=-, Forward Current=20mA, Illumination Color=黄色, JLCPCB Part Class="Extended Part", LCSC Part Name=黄灯, Lens Color=无色透明透镜, Manufacturer=LITEON(光宝), ManufacturerPart=LTST-C190KSKT, Operating Temperature=-30℃~+85℃, Power(Watts)=75mW, Voltage - Forward(Vf)=2.1V, AddInBom=yes, ConvertToPcb=yes, Datasheet=https://item.szlcsc.com/datasheet/LTST-C190KSKT/136371.html, Diode Configuration=独立二极管, FootprintName=LED0603-RD, Lamp Holder Type=-, Luminous Intensity=104mcd, ModelId=1f0d29a91be547639d425604e9b96ebb, ModelName=LED0603-RD, ModelTransform=63.7794,32.283,0,0,0,0,0,0,0, Mounting Style=-, Peak Wavelength=588nm, Supplier=LCSC, Supplier Footprint=0603, SupplierPart=C125095, Symbol=LTST-C190KSKT, Viewing Angle=130°, Wavelength - Dominant=584.5nm~597nm
P1: "连接器类型:板端/插座-闭口;固定方式:无固定装置;结构:1x2P;间距:3.81mm;颜色:绿色;安装方式:弯插;排数:1;每排PIN数:2;额定电流:8A;额定电压:300V;线规 - AWG:-;线规 - 平方毫米:-;工作温度:-40℃~+105℃;", Color=绿色, Current Rating=8A, JLCPCB Part Class="Extended Part", LCSC Part Name="无固定装置 1x2P 3.81mm 排数:1 每排P数:2", Manufacturer=KANGNEX(康奈克斯电气), ManufacturerPart=WJ15EDGRC-3.81-02P-14-00A, Operating Temperature=-40℃~+105℃, Voltage Rating (Max)=300V, AddInBom=yes, Connection Type=-, Connector Type=板端/插座-闭口, ConvertToPcb=yes, Datasheet=https://item.szlcsc.com/datasheet/WJ15EDGRC-3.81-02P-14-00A/8881.html, FootprintName=CONN-TH_2P-P3.81_WJ15EDGRC-3.81-2P, ModelId=816ec8aca6fe4785be70cb4c5121258d, ModelName=CONN-TH_2P_L8.5-W9.2-H7.0-P3.81, ModelTransform=334.645,360.2355,0,0,0,0,0,-118.11,-137.795, Mounting Type=弯插, Number of Pins=2P, Number of PINs Per Row=2, Number of Positions or Pins=1x2P, Number of Rows=1, Outlet Direction (Vertical Basis)=-, Pitch=3.81mm, Supplier=LCSC, Supplier Footprint=弯插,P=3.81mm, SupplierPart=C8387, Symbol=WJ15EDGRC-3.81-2P, Termination Style=无固定装置, Wire Gauge - AWG=-, Wire Gauge - mm2=-
R1 R2 R5 R8 R10 R11 R12 R14: "电阻类型:厚膜电阻;阻值:100Ω;精度:±1%;功率:100mW;工作电压:75V;温度系数:±100ppm/℃;", JLCPCB Part Class="Extended Part", LCSC Part Name="100Ω ±1% 100mW 厚膜电阻", Manufacturer=FOJAN(富捷), ManufacturerPart=FRC0603F1000TS, Operating Temperature=-55℃~+155℃, Power(Watts)=100mW, Temperature Coefficient=±100ppm/℃, Tolerance=±1%, Voltage-Supply(Max)=75V, AddInBom=yes, ConvertToPcb=yes, Datasheet=https://item.szlcsc.com/datasheet/FRC0603F1000TS/3180494.html, FootprintName=R0603, ModelId=fc143cca1e79419f9cd78b61e9279f08, ModelName=R0603, ModelTransform=31.8897,63.7794,0,90,0,0,0,0,0, Supplier=LCSC, Supplier Footprint=0603, SupplierPart=C2906981, Symbol=FRC0603F1000TS, Type=厚膜电阻
R3 R4 R7 R9: "电阻类型:厚膜电阻;阻值:47Ω;精度:±1%;功率:62.5mW;工作电压:50V;温度系数:±100ppm/℃;", JLCPCB Part Class="Extended Part", LCSC Part Name="47Ω ±1% 62.5mW 厚膜电阻", Manufacturer=FOJAN(富捷), ManufacturerPart=FRC0402F47R0TS, Operating Temperature=-55℃~+155℃, Power(Watts)=62.5mW, Temperature Coefficient=±100ppm/℃, Tolerance=±1%, Voltage-Supply(Max)=50V, AddInBom=yes, ConvertToPcb=yes, Datasheet=https://item.szlcsc.com/datasheet/FRC0402F47R0TS/3186297.html, FootprintName=R0402, ModelId=98c88bc2b9094f218f3a3e30a7012738, ModelName=R0402_L1.0-W0.5-H0.4, ModelTransform=39.37,19.685,0,0,0,0,0,0,0, Supplier=LCSC, Supplier Footprint=0402, SupplierPart=C2909362, Symbol=FRC0402F47R0TS, Type=厚膜电阻
R6: "电阻类型:厚膜电阻;阻值:10kΩ;精度:±1%;功率:100mW;工作电压:75V;温度系数:±100ppm/℃;", JLCPCB Part Class="Extended Part", LCSC Part Name="10kΩ ±1% 100mW 厚膜电阻", Manufacturer=FOJAN(富捷), ManufacturerPart=FRC0603F1002TS, Operating Temperature=-55℃~+155℃, Power(Watts)=100mW, Temperature Coefficient=±100ppm/℃, Tolerance=±1%, Voltage-Supply(Max)=75V, AddInBom=yes, ConvertToPcb=yes, Datasheet=https://item.szlcsc.com/datasheet/FRC0603F1002TS/3180495.html, FootprintName=R0603, ModelId=fc143cca1e79419f9cd78b61e9279f08, ModelName=R0603, ModelTransform=31.8897,63.7794,0,90,0,0,0,0,0, Supplier=LCSC, Supplier Footprint=0603, SupplierPart=C2906982, Symbol=FRC0603F1002TS, Type=厚膜电阻
R13: "电阻类型:厚膜电阻;阻值:0Ω;精度:±1%;功率:100mW;工作电压:75V;温度系数:-;", JLCPCB Part Class="Basic Part", LCSC Part Name="0Ω ±1% 100mW 厚膜电阻", Manufacturer=UNI-ROYAL(厚声), ManufacturerPart=0603WAF0000T5E, Operating Temperature=-55℃~+155℃, Power(Watts)=100mW, Temperature Coefficient=-, Tolerance=±1%, Voltage-Supply(Max)=75V, AddInBom=yes, ConvertToPcb=yes, Datasheet=https://item.szlcsc.com/datasheet/0603WAF0000T5E/21903.html, FootprintName=R0603, ModelId=fc143cca1e79419f9cd78b61e9279f08, ModelName=R0603, ModelTransform=31.8897,63.7794,0,90,0,0,0,0,0, Supplier=LCSC, Supplier Footprint=0603, SupplierPart=C21189, Symbol=0603WAF0000T5E, Type=厚膜电阻
R15 R18: "电阻类型:厚膜电阻;阻值:1kΩ;精度:±1%;功率:62.5mW;工作电压:50V;温度系数:±100ppm/℃;", JLCPCB Part Class="Basic Part", LCSC Part Name="厚膜电阻 1kΩ ±1%", Manufacturer=UNI-ROYAL(厚声), ManufacturerPart=0402WGF1001TCE, Operating Temperature=-55℃~+155℃, Power(Watts)=62.5mW, Temperature Coefficient=±100ppm/℃, Tolerance=±1%, Voltage-Supply(Max)=50V, AddInBom=yes, ConvertToPcb=yes, Datasheet=https://item.szlcsc.com/datasheet/0402WGF1001TCE/12256.html, FootprintName=R0402, ModelId=98c88bc2b9094f218f3a3e30a7012738, ModelName=R0402_L1.0-W0.5-H0.4, ModelTransform=39.37,19.685,0,0,0,0,0,0,0, Supplier=LCSC, Supplier Footprint=0402, SupplierPart=C11702, Symbol=0402WGF1001TCE, Type=厚膜电阻
R16: "电阻类型:厚膜电阻;阻值:120Ω;精度:±1%;功率:62.5mW;工作电压:50V;温度系数:±100ppm/℃;", JLCPCB Part Class="Basic Part", LCSC Part Name="厚膜电阻 120Ω ±1%", Manufacturer=UNI-ROYAL(厚声), ManufacturerPart=0402WGF1200TCE, Operating Temperature=-55℃~+155℃, Power(Watts)=62.5mW, Temperature Coefficient=±100ppm/℃, Tolerance=±1%, Voltage-Supply(Max)=50V, AddInBom=yes, ConvertToPcb=yes, Datasheet=https://item.szlcsc.com/datasheet/0402WGF1200TCE/25822.html, FootprintName=R0402, ModelId=98c88bc2b9094f218f3a3e30a7012738, ModelName=R0402_L1.0-W0.5-H0.4, ModelTransform=39.37,19.685,0,0,0,0,0,0,0, Supplier=LCSC, Supplier Footprint=0402, SupplierPart=C25079, Symbol=0402WGF1200TCE, Type=厚膜电阻
R17: "电阻类型:厚膜电阻;阻值:3kΩ;精度:±1%;功率:125mW;工作电压:150V;温度系数:±100ppm/℃;", JLCPCB Part Class="Extended Part", LCSC Part Name="3kΩ ±1% 125mW 厚膜电阻", Manufacturer=FOJAN(富捷), ManufacturerPart=FRC0805F3001TS, Operating Temperature=-55℃~+155℃, Power(Watts)=125mW, Temperature Coefficient=±100ppm/℃, Tolerance=±1%, Voltage-Supply(Max)=150V, AddInBom=yes, ConvertToPcb=yes, Datasheet=https://item.szlcsc.com/datasheet/FRC0805F3001TS/3180776.html, FootprintName=R0805, ModelId=37a81e68749a4138bd2dfa6897b24b85, ModelName=R0805_L2.0-W1.3-H0.6, ModelTransform=78.74,51.181,0,0,0,0,0,-0.0005,0, Supplier=LCSC, Supplier Footprint=0805, SupplierPart=C2907263, Symbol=FRC0805F3001TS, Type=厚膜电阻
R19: "电阻类型:厚膜电阻;阻值:4.7kΩ;精度:±1%;功率:100mW;工作电压:75V;温度系数:±100ppm/℃;", JLCPCB Part Class="Extended Part", LCSC Part Name="4.7kΩ ±1% 100mW 厚膜电阻", Manufacturer=FOJAN(富捷), ManufacturerPart=FRC0603F4701TS, Operating Temperature=-55℃~+155℃, Power(Watts)=100mW, Temperature Coefficient=±100ppm/℃, Tolerance=±1%, Voltage-Supply(Max)=75V, AddInBom=yes, ConvertToPcb=yes, Datasheet=https://item.szlcsc.com/datasheet/FRC0603F4701TS/3180547.html, FootprintName=R0603, ModelId=fc143cca1e79419f9cd78b61e9279f08, ModelName=R0603, ModelTransform=31.8897,63.7794,0,90,0,0,0,0,0, Supplier=LCSC, Supplier Footprint=0603, SupplierPart=C2907034, Symbol=FRC0603F4701TS, Type=厚膜电阻
R20: "电阻类型:厚膜电阻;阻值:470Ω;精度:±5%;功率:100mW;工作电压:75V;温度系数:±100ppm/℃;", JLCPCB Part Class="Extended Part", LCSC Part Name="470Ω ±5% 100mW 厚膜电阻", Manufacturer=FOJAN(富捷), ManufacturerPart="FRC0603J471 TS", Operating Temperature=-55℃~+155℃, Power(Watts)=100mW, Temperature Coefficient=±100ppm/℃, Tolerance=±5%, Voltage-Supply(Max)=75V, AddInBom=yes, ConvertToPcb=yes, FootprintName=R0603, ModelId=fc143cca1e79419f9cd78b61e9279f08, ModelName=R0603, ModelTransform=31.8897,63.7794,0,90,0,0,0,0,0, Supplier=LCSC, Supplier Footprint=0603, SupplierPart=C2907172, Symbol="FRC0603J471 TS", Type=厚膜电阻
R21 R22 R23 R27 R28 R29: "电阻类型:厚膜电阻;阻值:1kΩ;精度:±1%;功率:100mW;工作电压:75V;温度系数:±100ppm/℃;", JLCPCB Part Class="Basic Part", LCSC Part Name="1kΩ ±1% 100mW 厚膜电阻", Manufacturer=UNI-ROYAL(厚声), ManufacturerPart=0603WAF1001T5E, Operating Temperature=-55℃~+155℃, Power(Watts)=100mW, Temperature Coefficient=±100ppm/℃, Tolerance=±1%, Voltage-Supply(Max)=75V, AddInBom=yes, ConvertToPcb=yes, Datasheet=https://item.szlcsc.com/datasheet/0603WAF1001T5E/21904.html, FootprintName=R0603, ModelId=fc143cca1e79419f9cd78b61e9279f08, ModelName=R0603, ModelTransform=31.8897,63.7794,0,90,0,0,0,0,0, Supplier=LCSC, Supplier Footprint=0603, SupplierPart=C21190, Symbol=0603WAF1001T5E, Type=厚膜电阻
R24: "电阻类型:薄膜电阻;阻值:26.1kΩ;精度:±0.1%;功率:62.5mW;工作电压:50V;温度系数:±25ppm/℃;", JLCPCB Part Class="Extended Part", LCSC Part Name="薄膜电阻 26.1kΩ ±0.1% 62.5mW", Manufacturer=YAGEO(国巨), ManufacturerPart=RT0402BRD0726K1L, Operating Temperature=-55℃~+155℃, Power(Watts)=62.5mW, Temperature Coefficient=±25ppm/℃, Tolerance=±0.1%, Voltage-Supply(Max)=50V, AddInBom=yes, ConvertToPcb=yes, Datasheet=https://item.szlcsc.com/datasheet/RT0402BRD0726K1L/775872.html, FootprintName=R0402, ModelId=98c88bc2b9094f218f3a3e30a7012738, ModelName=R0402_L1.0-W0.5-H0.4, ModelTransform=39.37,19.685,0,0,0,0,0,0,0, Supplier=LCSC, Supplier Footprint=0402, SupplierPart=C728557, Symbol=RT0402BRD0726K1L, Type=薄膜电阻
R25: "电阻类型:厚膜电阻;阻值:137kΩ;精度:±1%;功率:62.5mW;工作电压:50V;温度系数:±100ppm/℃;", JLCPCB Part Class="Extended Part", LCSC Part Name="137kΩ ±1% 62.5mW 厚膜电阻", Manufacturer=FOJAN(富捷), ManufacturerPart=FRC0402F1373TS, Operating Temperature=-55℃~+155℃, Power(Watts)=62.5mW, Temperature Coefficient=±100ppm/℃, Tolerance=±1%, Voltage-Supply(Max)=50V, AddInBom=yes, ConvertToPcb=yes, Datasheet=https://item.szlcsc.com/datasheet/FRC0402F1373TS/5781091.html, FootprintName=R0402, ModelId=98c88bc2b9094f218f3a3e30a7012738, ModelName=R0402_L1.0-W0.5-H0.4, ModelTransform=39.37,19.685,0,0,0,0,0,0,0, Supplier=LCSC, Supplier Footprint=0402, SupplierPart=C5153963, Symbol=FRC0402F1373TS, Type=厚膜电阻
R26: "电阻类型:厚膜电阻;阻值:3.6kΩ;精度:±1%;功率:100mW;工作电压:75V;温度系数:±100ppm/℃;", JLCPCB Part Class="Extended Part", LCSC Part Name="3.6kΩ ±1% 100mW 厚膜电阻", Manufacturer=FOJAN(富捷), ManufacturerPart=FRC0603F3601TS, Operating Temperature=-55℃~+155℃, Power(Watts)=100mW, Temperature Coefficient=±100ppm/℃, Tolerance=±1%, Voltage-Supply(Max)=75V, AddInBom=yes, ConvertToPcb=yes, FootprintName=R0603, ModelId=fc143cca1e79419f9cd78b61e9279f08, ModelName=R0603, ModelTransform=31.8897,63.7794,0,90,0,0,0,0,0, Supplier=LCSC, Supplier Footprint=0603, SupplierPart=C2933208, Symbol=FRC0603F3601TS, Type=厚膜电阻
SW1 SW2: "电路结构:单刀单掷;按钮形状:圆形按钮;作用力:1.6N;安装方式:立贴;开关长度:3.9mm;开关宽度:3mm;开关高度:2mm;带支架:不带支架;触点电流:50mA;额定电压:12V;带灯:-;工作寿命:10万次;", Actuator/Cap Color=黑色, Contact Current=50mA, IP Rating=-, JLCPCB Part Class="Basic Part", LCSC Part Name="3.9*3*2mm 立贴 轻触开关", Manufacturer=XUNPU(讯普), ManufacturerPart=TS-1088-AR02016, Operating Force=1.6N, Operating Temperature=-30℃~+80℃, Voltage Rating=12V, Actuator Style=圆形按钮, AddInBom=yes, Circuit=单刀单掷, ConvertToPcb=yes, Datasheet=https://item.szlcsc.com/datasheet/TS-1088-AR02016/763484.html, FootprintName=SW-SMD_L3.9-W3.0-P4.45, Length=3.9mm, Life=10万次, ModelId=b26698b69f274ffabef8a26c7d0e5dd1, ModelName=SW-SMD_L3.9-W2.9-H2.0-LS4.8, ModelTransform=188.976,114.174,0,0,0,0,0,0,0, Mounting Type=立贴, Supplier=LCSC, Supplier Footprint=SMD,4x3mm, SupplierPart=C720477, Switch Height=2mm, Symbol=TS-1088-AR02016, Termination Style=SMD接片, Width=3mm, with Bracket=不带支架, With Lamp=-
U3: "CPU内核:ARM Cortex-M0+;CPU最大主频:64MHz;CPU位数:32 Bit;", JLCPCB Part Class="Extended Part", LCSC Part Name="主流Arm Cortex-M0+ MCU，具有64 KB Flash存储器、8 KB RAM、64 MHz CPU、2x USART、定时器、ADC和通信接口，1.7-3.6V", Manufacturer=ST(意法半导体), ManufacturerPart=STM32G031C8T6, Operating Temperature=-40℃~+85℃, Voltage - Supply=1.7V~3.6V, ADC (Bit)=12bit, AddInBom=yes, ConvertToPcb=yes, Core Size="32 Bit", CPU Core="ARM Cortex-M0+", CPU Maximum Speed=64MHz, Datasheet=https://item.szlcsc.com/datasheet/STM32G031C8T6/428993.html, EEPROM=-, FootprintName=LQFP-48_L7.0-W7.0-P0.50-LS9.0-BL, ModelId=093be70396ff421eb2cdb946d5311efc, ModelName=LQFP-48_L7.0-W7.0-H1.4-LS9.0-P0.50, ModelTransform=354.331,354.331,0,0,0,0,0,0,0, Number of I/O=44, Oscillator Type=内置+外置, Program Memory Type=FLASH, Program Storage Size=64KB, RAM Size=8KB, Supplier=LCSC, Supplier Footprint=LQFP-48(7x7), SupplierPart=C432205, Symbol=STM32G031C8T6
U5: "分辨率(位):24;采样率:4kHz;工作电压:2.7V~5.25V;接口类型:SPI;", Clock Frequency=4.096MHz, JLCPCB Part Class="Extended Part", LCSC Part Name="具有PGA和电压基准的低功耗、低噪声、高集成度6通道及12通道4kSPS、24位∑-Δ ADC", Manufacturer=TI(德州仪器), ManufacturerPart=ADS124S08IPBSR, Operating Temperature=-50℃~+125℃, Quiescent Current (Iq)=280uA, Voltage - Supply=2.7V~5.25V, Voltage Reference=内置, AddInBom=yes, Clock/Oscillator=内置, ConvertToPcb=yes, Datasheet=https://www.ti.com.cn/cn/lit/ds/symlink/ads124s08.pdf?ts=1739413233444&ref_url=https%253A%252F%252Fwww.ti.com.cn%252Fproduct%252Fcn%252FADS124S08, differential input=是, Features=多路复用器；双极性电源；自动校准；内置温度传感器, FootprintName=TQFP-32_L5.0-W5.0-P0.50-LS7.0-BL, Interface=SPI, ModelId=0723864a05e7424ab80b3c78d6a7d93a, ModelName=TQFP-32_L5.0-W5.0-H1.2-LS7.0-P0.50, ModelTransform=277.58783,277.58783,0,90,0,0,0.013,0,0, number of channels=12, Programmable Gain=支持, Resolution (Bits)=24, Sampling Rate=4kHz, Supplier=LCSC, Supplier Footprint=TQFP-32(5x5), SupplierPart=C39676001, Symbol=ADS124S08IPBSR_C39676001
U7: "类型:收发器;数据速率:20Mbps;", JLCPCB Part Class="Extended Part", LCSC Part Name="SN65HVD72, SN65HVD75, SN65HVD78 具有IEC ESD保护的3.3V电源RS-485", Manufacturer=TI(德州仪器), ManufacturerPart=SN65HVD75DR, Operating Temperature=-40℃~+125℃, Quiescent Supply Current=950uA, Voltage - Supply=3V~3.6V, AddInBom=yes, Communication Mode=半双工, ConvertToPcb=yes, Data Rate=20Mbps, Datasheet=https://www.ti.com/cn/lit/gpn/sn65hvd75, ESD Protect=±15kV, FootprintName=SOIC-8_L4.9-W3.9-P1.27-LS6.0-BL, ModelId=e81d2f7d937b4a6ab1dca543ff5d56a4, ModelName=SOIC-8_L4.9-W3.9-H1.7-LS6.0-P1.27, ModelTransform=192.913,236.22,0,0,0,0,0,0,0, Number of Drivers=1, Number of Nodes=213, Number of Receivers=1, Supplier=LCSC, Supplier Footprint=SOIC-8, SupplierPart=C57928, Symbol=SN65HVD75DR, Type=收发器
U8: "类型:高侧开关;通道数:1;输入控制逻辑:高电平有效;工作电压:3.5V~40V;最大连续电流:4A;导通电阻:80mΩ;", JLCPCB Part Class="Extended Part", LCSC Part Name=单通道高侧开关，具备全面诊断功能、宽工作电压范围和可调节电流限制, Manufacturer=TI(德州仪器), ManufacturerPart=TPS27S100APWPR, Maximum Continuous Current=4A, Operating Temperature	-=-40℃~+125℃, Voltage - Supply=3.5V~40V, AddInBom=yes, Control Input Logic=高电平有效, ConvertToPcb=yes, Datasheet=https://www.ti.com/cn/lit/ds/symlink/tps27s100.pdf, Features=集成电荷泵；短路保护；反向电流阻断；过温保护；过流保护；欠压锁定, FootprintName=TSSOP-14_L5.0-W4.4-P0.65-LS6.4-BL-EP, ModelId=02f1f60386074b2ca8e111040ac061f2, ModelName=TSSOP-14_L5.0-W4.4-H1.0-LS6.4-P0.65, ModelTransform=236.714,196.85,0,90,0,0,0,0.0005,0, number of channels=1, RDS(on)=80mΩ, Supplier=LCSC, Supplier Footprint=HTSSOP-14-EP, SupplierPart=C2879389, Symbol=TPS27S100APWPR, Type=高侧开关
U9: "功能类型:降压型;工作电压:3.8V~32V;输出电压:-;输出电流:2A;输出类型:可调;", Frequency - Switching=500kHz, JLCPCB Part Class="Extended Part", LCSC Part Name="降压型 2A 3.8V~32V", Manufacturer=DIODES(美台), ManufacturerPart=AP63201WU-7, Operating Temperature=-40℃~+85℃, Output Current=2A, Output Voltage=-, Quiescent Current=22uA, Voltage - Supply=3.8V~32V, AddInBom=yes, ConvertToPcb=yes, Datasheet=https://item.szlcsc.com/datasheet/AP63201WU-7/2162627.html, Features=轻载高效模式；逐波限流；过流保护；EMI优化(抖频模式)；打嗝限流, FootprintName=TSOT-23-6_L2.9-W1.6-P0.95-LS2.8-BR, Function=降压型, ModelId=2c4039b5b88644c1bda4b4ba9e971667, ModelName=TSOT-23-6_L2.9-W1.6-H1.1-LS2.8-P0.95, ModelTransform=110.45568,114.173,0,180,0,0,-0.005,-0.0005,0, Number of Outputs=1, Output Type=可调, Supplier=LCSC, Supplier Footprint=TSOT-23-6, SupplierPart=C2071044, Switch tube (built-in/external)=内置, Symbol=AP63201WU-7, Synchronous Rectifier=是, Topology=降压式
U10 U11: "输出类型:固定;最大输入电压:6V;输出电压:3.3V;输出电流:300mA;输出极性:正极;", Dropout Voltage=140mV@(300mA), JLCPCB Part Class="Extended Part", LCSC Part Name="具有高 PSRR 的 300mA、超低噪声、低 IQ、低压降 (LDO) 线性稳压器", Manufacturer=TI(德州仪器), ManufacturerPart=TPS7A2033PDBVR, Maximum Input Voltage=6V, Operating Temperature=-40℃~+125℃@(Tj), Output Current=300mA, Output Voltage=3.3V, standby current=15uA, AddInBom=yes, ConvertToPcb=yes, Datasheet=https://www.ti.com/cn/lit/gpn/tps7a20, Feature=防静电保护；软启动；浪涌保护；低ESR；热保护(TSD)；欠压闭锁；过流保护(OCP)；带使能；防倒灌, FootprintName=SOT-23-5_L2.9-W1.6-P0.95-LS2.8-BR, ModelId=7ba65df16e7b4570af156e925f9c37fe, ModelName=SOT-23-5_L2.9-W1.6-P0.95-LS2.8-BR, ModelTransform=114.173,114.173,0,90,0,0,0,0,0, Number of Outputs=1, Output Polarity=正极, Output Type=固定, Supplier=LCSC, Supplier Footprint=SOT-23-5, SupplierPart=C2862740, Symbol=TPS7A2033PDBVR
X1: "晶振类型:贴片晶振;频率:8MHz;常温频差:±10ppm;负载电容:12pF;频率稳定度:±20ppm;", Equivalent Series Resistance(ESR)=180Ω, Frequency Stability=±20ppm, JLCPCB Part Class="Extended Part", LCSC Part Name="YSX321SL 8MHZ 4P 3225 12PF ±10PPM -40~85℃ (±20PPM)", Load Capacitance=12pF, Manufacturer=YXC(扬兴晶振), ManufacturerPart=X32258MOB4SI, Normal temperature Frequency Tolerance=±10ppm, Operating Temperature=-40℃~+85℃, AddInBom=yes, ConvertToPcb=yes, Datasheet=https://item.szlcsc.com/datasheet/X32258MOB4SI/2777872.html, FootprintName=CRYSTAL-SMD_4P-L3.2-W2.5-BL, ModelId=ff2dfd5650294453a14147960efe1838, ModelName=CRYSTAL-SMD_4P-L3.2-W2.5-BL, ModelTransform=125.984,98.425,0,0,0,0,0,0,0, Supplier=LCSC, Supplier Footprint=SMD3225-4P, SupplierPart=C2682775, Symbol=X32258MOB4SI, Type=贴片晶振
U1: AddInBom=yes, ConvertToPcb=yes
U2 U4 U6: AddInBom=yes, ConvertToPcb=yes, SymbolName=PT1000焊盘

## Via types
v1: diameter 24, hole 12, Top Layer to Bottom Layer, tented both sides, 125 vias
v2: diameter 24, hole 12, Top Layer to Bottom Layer, 4 vias

## Nets (pads, with @x,y where several pads share a name; then routed paths per layer and width w, separated by ;. In a path a pad name is that pad's centre, name@x,y a point inside that pad or via, vN(x,y) a via of type N, cw(c..) or ccw(c..) an arc to the next point about the centre after c; other vN are vias at no path point)
3V3: C1.1 C2.1 C5.2 C7.1 C8.1 C21.2 C26.1 C28.1 H2.1 R6.2 R18.1 R19.2 R21.2 R27.2 R29.2 U3.4 U3.5 U3.6 U5.15 U5.16 U5.18 U7.8 U10.5 | length 4159
  Top Layer w10: v1(2280,2110) R19.2@2280,2064.66 2251.58,2036.24 2251.58,1969.08 2372.87,1847.78 2491.13,1847.78 ; v1(2467.99,2244.01) 2484.82,2227.18 R27.2@2497.82,2227.18 2551.49,2280.84 R21.2@2551.49,2283.51 ; R6.2@2491.13,1815.34 2491.13,1847.78 ; 2650.66,1655.81 2650.66,1705.94 2508.82,1847.78 2491.13,1847.78 ; U5.15@2830.1,2525.82 U5.16@2844.01,2511.91 2844.68,2511.91 2845.69,2512.91 2911.41,2447.19 C5.2@2946.86,2447.19 2892.09,2501.96 2892.09,2529.66 2909.14,2546.7 2925.87,2546.7 2946.74,2525.83 U5.18@2947.02,2525.83 ; v1(3475,1980) 3476.48,1981.48 3476.48,2013.52 R18.1@3477.96,2015 ; U7.8@3620,2080 3620,2081.37 3626.07,2087.44 C21.2@3690,2087.44 v1(3690,2050)
  Top Layer w15: R29.2@2489.66,1415 2637.2,1415 H2.1@2640.05,1412.16 2700,1472.11 2700,1630 ; R6.2@2490,1815.34 R6.2@2491.13,1815.34 ; 2650.66,1655.81 2650.66,1625.81 2658.91,1617.56 C28.1@2660,1617.56 ; C8.1@2970.46,2382.16 3017.79,2334.83 3017.79,2318.88 3020.94,2315.74 3027.3,2315.74 3029.02,2314.02 3284.93,2314.02 3335.13,2364.21 3601.85,2364.21 3721.22,2244.85 3721.22,2116.69 3691.97,2087.44 C21.2@3690,2087.44
  Bottom Layer w10: v1(2280,2110) 2414.01,2244.01 v1(2467.99,2244.01) ; v1(3475,1980) 3476.19,1981.19 3621.19,1981.19 v1(3690,2050)
  Bottom Layer w15: v1(2690,1650) 2609.18,1730.82 2609.18,1907.21 v1@3019.61,2317.64
  other v1: 3019.21,2317.46